# Altium PCB MainBoardPCB_4.PcbDoc (part 20 of 32)
Units mm, origin at the board's own origin, x right, y up, seen from the top; angles counter-clockwise.
Board outline 333.63 x 349.38 mm, 16 copper layers (L1, L2 (GND), L3 (Sign), L4 (GND), L5 (Sign), L6 (PWR/GND), L7(PWR/GND), L8 (Plane_GND), L9 (PWR/GND), L10 (PWR/GND), L11 (PWR/GND), L12 (Sign), L13 (GND), L14 (Sign), L15 (GND), L16), stack 2.502 mm thick; 2205 components, 1648 nets, 8314 pads, 3172 vias.
Unrouted connection lines stored in the file: 5141.
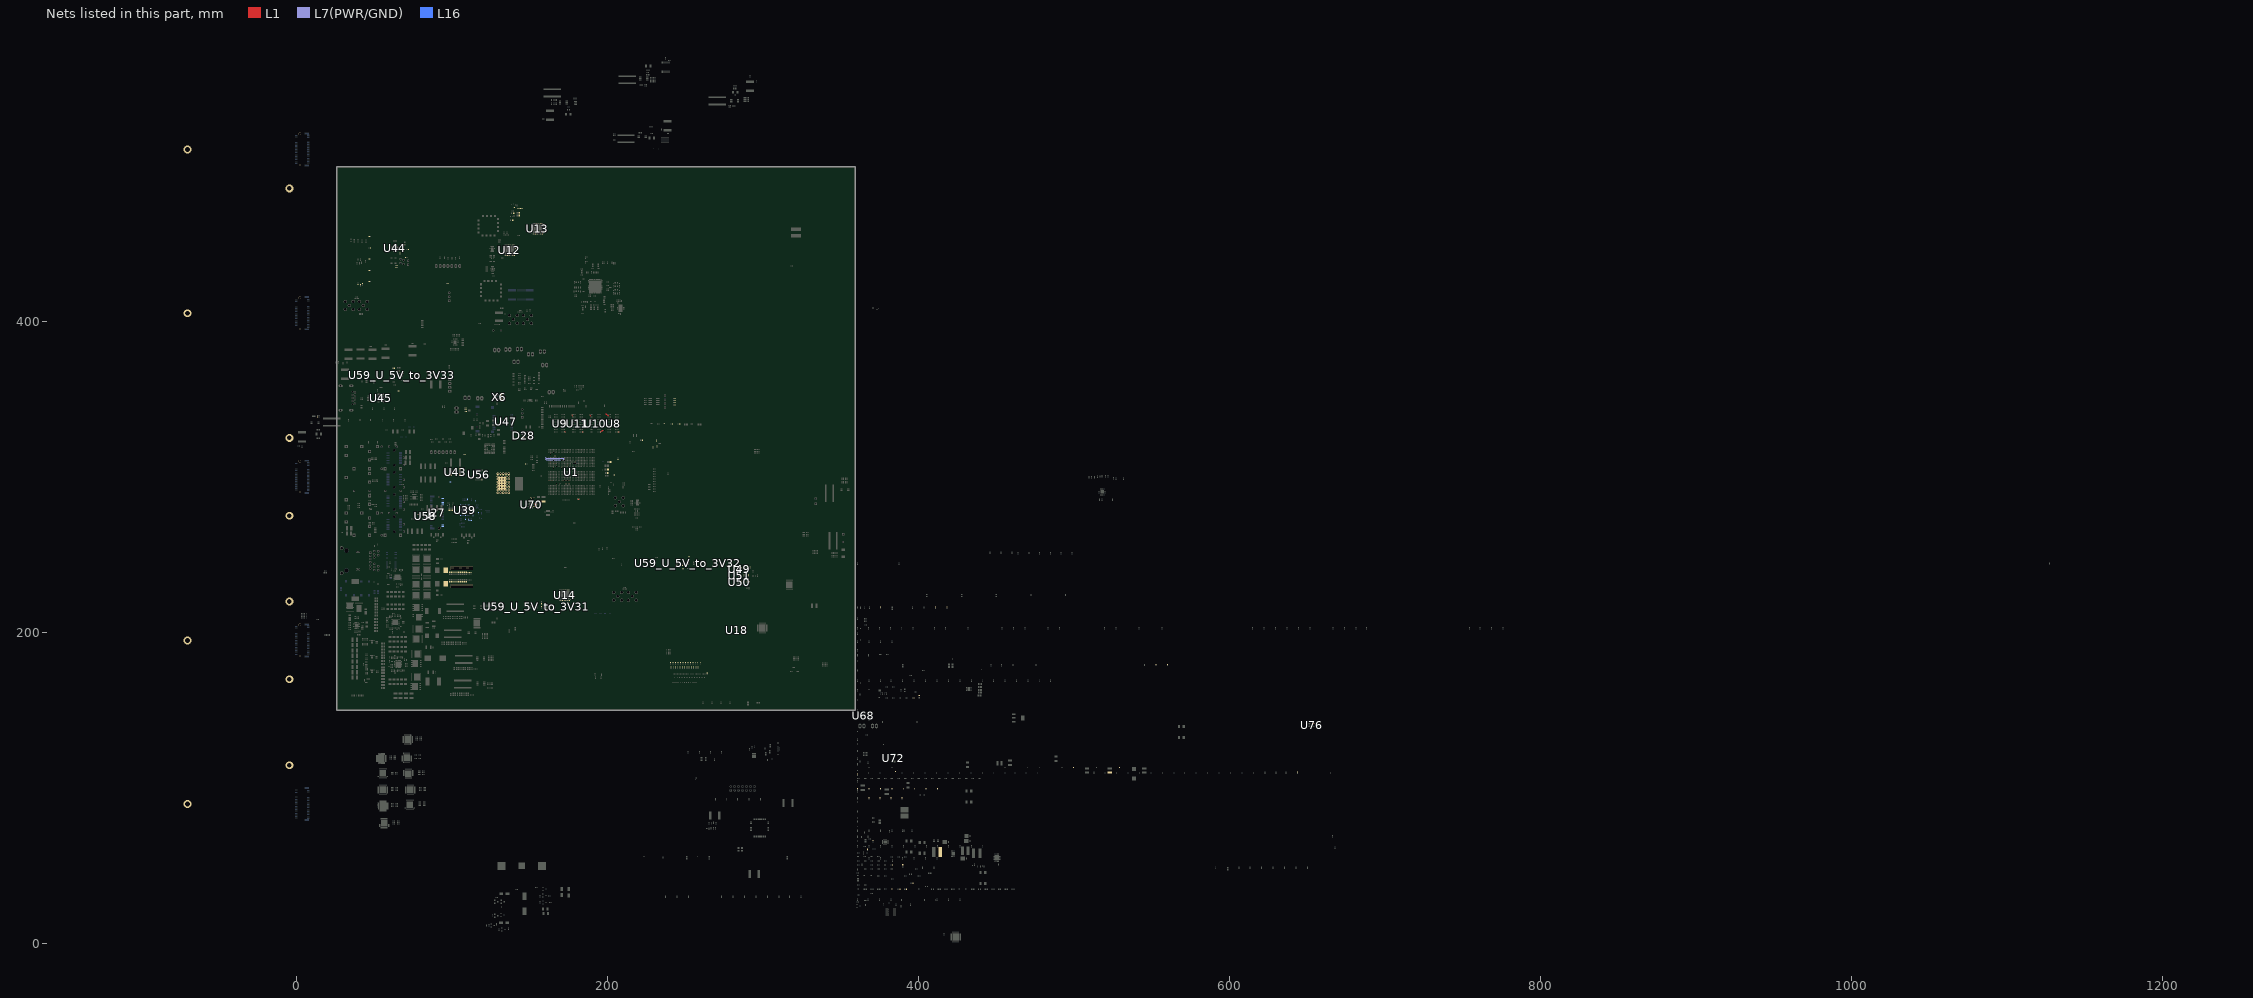
[diagram p21: the nets of this part, all layers, seen from the top]

## Part data (continued)
U4 U5 U48: Manufacturer 1="Texas Instruments", Supplier Part Number 1=296-53412-1-ND, Manufacturer Part Number 1=TPS2121 (continued)
  U5: ComponentLink1Description=Datasheet, ComponentLink1URL=http://www.ti.com/lit/ds/symlink/tps2120.pdf
U6 U7 U17 U18 U20 U21 U22 U23 U46: "Current Limit Load Switch with OVP and TRCB, 28 V, 5 A", Manufacturer 1="ON Semiconductor", Supplier Part Number 1=863-FPF2895CUCX, Manufacturer Part Number 1=FPF2895CUCX, Pricing 1="1=2,18000, 10=1,85000, 100=1,48000, 500=1,29000, 1000=1,07000, 3000=1,00000, 6000=0,96500, 9000=0,92800, 24000=0,89200 (USD)", RoHS=No, Stock 1=808, Supplier 1=Mouser
U8 U9 U10 U11: "RAM 8GB", Frequency=1.2GHz, Manufacturer="Micron Technology", Manufacturer Part Number=MT40A512M16JY-083EIT:BTR, Max Operating Temperature=95°C, Min Operating Temperature=-40°C, Supplier Part Number 1=557-1690-2-ND, ComponentLink1Description=https://www.micron.com/~/media/documents/products/data-sheet/dram/ddr4/8gb_ddr4_sdram.pdf?src-supplier=Digi-Key, ComponentLink1URL=https://www.micron.com/~/media/documents/products/data-sheet/dram/ddr4/8gb_ddr4_sdram.pdf?src-supplier=Digi-Key, Interface=Parallel, Memory Type=RAM,SDRAM, Pricing 1="2000 = 12,80254 (USD)", RoHS=Yes, Stock 1=0, Supplier 1=Digi-Key
U12 U13 U14: "Dystrybutor Zegarów", Manufacturer="Analog Devices", Manufacturer Part Number=LTC6952IUKG#PBF, Supplier Part Number 1=LTC6952IUKG#PBF-ND, Number of Pins=52, Pricing 1="1 = 30,78000, 25 = 24,62680, 100 = 21,36000, 250 = 20,50564, 500 = 19,86492 (USD)", RoHS=No, Stock 1=267, Supplier 1=Digi-Key
U15 U24_SPI_bridge1 U24_SPI_bridge2 U24_SPI_bridge3 U25_SPI_bridge1 U25_SPI_bridge2 U25_SPI_bridge3 U26_SPI_bridge1 U26_SPI_bridge2 U26_SPI_bridge3 U27_SPI_bridge1 U27_SPI_bridge2 U27_SPI_bridge3 U28_SPI_bridge1 U28_SPI_bridge2 U28_SPI_bridge3 U43 U53 U56 U57 U79: Manufacturer 1="Texas Instruments", Supplier Part Number 1=296-SN74AXC4T774PWRCT-ND, Manufacturer Part Number 1=SN74AXC4T774PWR, Pricing 1="1=1,14000, 10=1,01500, 100=0,79120, 500=0,65364, 1000=0,51603 (USD)", RoHS=No, Stock 1=2000, Supplier 1=Digi-Key
U16: Manufacturer="Texas Instruments", Manufacturer Part Number=LMK05028RGCR, Supplier Part Number 1=296-49099-1-ND, ComponentLink1Description=http://www.ti.com/lit/ds/symlink/lmk05028.pdf?src-supplier=Digi-Key, ComponentLink1URL=http://www.ti.com/lit/ds/symlink/lmk05028.pdf?src-supplier=Digi-Key, Number of Inputs=4, Number of Outputs=8, Pricing 1="1 = 32,36000, 10 = 29,84800, 100 = 25,48800 (USD)", RoHS=No, Stock 1=230, Supplier 1=Digi-Key, Supplier 2=Digi-Key, Supplier 3=Mouser, Supplier Part Number 2=296-49099-6-ND, Supplier Part Number 3=595-LMK05028RGCT
U19: "Quad 40 V / 1 A Step-Down Switching Regulator with 100% Duty Cycle Operation, 28-pin QFN (UFD-28), -40 to 125 degC, Pb-Free", Manufacturer="Linear Technology", Supplier Part Number 1=LT3504EUFD#PBF-ND, Code_JEDEC=MO-220, ComponentLink1Description="Manufacturer URL", ComponentLink1URL=http://www.linear.com/, ComponentLink2Description=Datasheet, ComponentLink2URL=http://cds.linear.com/docs/en/datasheet/3504fa.pdf, ComponentLink3Description="Package Specification", ComponentLink3URL=http://cds.linear.com/docs/en/packaging/QFN_28_05-08-1712.pdf, Mounting Technology="Surface Mount", Number of Outputs=4, PackageDescription="28-Pin Plastic QFN, Body 5 x 4 mm, Pitch 0.5 mm", PackageReference=UFD-28, PackageVersion="Rev. B, 06/2010", PartNumber=LT3504EUFD#PBF, RoHS=TRUE, Supplier 1=Digi-Key, Supplier 2=Farnell, Supplier 3=Newark, Supplier Part Number 2=2215129, Supplier Part Number 3=27W9523
U30: "DAC 20bit", Case/Package=SSOP, Manufacturer="Texas Instruments", Manufacturer Part Number=DAC1220E, Max Operating Temperature=85°C, Max Supply Voltage=5.25V, Min Operating Temperature=-40°C, Min Supply Voltage=4.75V, Nominal Supply Current=460uA, Operating Supply Voltage=5V, Package Quantity=75, Power Consumption=2.5mW, Supplier Part Number 1=DAC1220E-ND, ComponentLink1Description=https://datasheet.ciiva.com/1494/1762528-1494337.pdf?src-supplier=Element14, ComponentLink1URL=https://datasheet.ciiva.com/1494/1762528-1494337.pdf?src-supplier=Element14, ComponentLink2Description=https://datasheet.ciiva.com/25983/sbas082g-25983810.pdf?src-supplier=Avnet+Europe, ComponentLink2URL=https://datasheet.ciiva.com/25983/sbas082g-25983810.pdf?src-supplier=Avnet+Europe, ComponentLink3Description=https://datasheet.ciiva.com/14152/uz642298-e-14152445.pdf?src-supplier=Distrelec, ComponentLink3URL=https://datasheet.ciiva.com/14152/uz642298-e-14152445.pdf?src-supplier=Distrelec, ComponentLink4Description=https://datasheet.ciiva.com/26804/dac1220e-26804784.pdf?src-supplier=IIIC, ComponentLink4URL=https://datasheet.ciiva.com/26804/dac1220e-26804784.pdf?src-supplier=IIIC, ComponentLink5Description=https://datasheet.ciiva.com/15146/getdatasheetpartid-224186-15146981.pdf?src-supplier=Verical, ComponentLink5URL=https://datasheet.ciiva.com/15146/getdatasheetpartid-224186-15146981.pdf?src-supplier=Verical, ComponentLink6Description=https://datasheet.ciiva.com/3040/sbas082g-3040444.pdf?src-supplier=Avnet, ComponentLink6URL=https://datasheet.ciiva.com/3040/sbas082g-3040444.pdf?src-supplier=Avnet, ComponentLink7Description=https://datasheet.ciiva.com/1364/dac1220-1364430.pdf?src-supplier=Digi-Key, ComponentLink7URL=https://datasheet.ciiva.com/1364/dac1220-1364430.pdf?src-supplier=Digi-Key, Contact Plating=Gold, Conversion Rate=500S/s, Differential Nonlinearity=1LSB, Full Scale Error=10LSB, Height=1.5mm, Integral Nonlinearity (INL)=1LSB, Interface=SPI, Lead Free="Lead Free", Length=5mm, Number of Bits=20, Number of Channels=1, Number of Converters=1, Number of DAC Channels=1, Number of Pins=16, Output Type=Voltage, Packaging=Rail/Tube, Polarity=Unipolar, Pricing 1="1 = 19,80000, 10 = 18,19400, 25 = 17,44000, 100 = 15,36600, 500 = 13,66916 (USD)", Radiation Hardening=No, REACH SVHC="No SVHC", Resolution=20b, RoHS=Yes, Sampling Rate=500S/s, Settling Time=2000us, Stock 1=237, Supplier 1=Digi-Key, Supply Type=Analog,Digital, Weight=0.002603oz, Width=4mm
U31 U32: "IC BUFFER 2:4 LVPECL MUX 16QFN", Case/Package=QFN, Frequency=1.25GHz, Manufacturer 1="Silicon Labs", Max Operating Temperature=85°C, Max Supply Voltage=3.63V, Min Operating Temperature=-40°C, Min Supply Voltage=2.38V, Nominal Supply Current=210mA, Package Quantity=100, Supplier Part Number 1=336-2500-5-ND, ComponentLink1Description=https://datasheet.ciiva.com/24019/si53323-258666-24019274.pdf?src-supplier=Mouser, ComponentLink1URL=https://datasheet.ciiva.com/24019/si53323-258666-24019274.pdf?src-supplier=Mouser, ComponentLink2Description=https://datasheet.ciiva.com/30480/0900766b812accf9-30480970.pdf?src-supplier=RSComponents, ComponentLink2URL=https://datasheet.ciiva.com/30480/0900766b812accf9-30480970.pdf?src-supplier=RSComponents, ComponentLink3Description=https://datasheet.ciiva.com/29883/si53323-29883370.pdf?src-supplier=Avnet, ComponentLink3URL=https://datasheet.ciiva.com/29883/si53323-29883370.pdf?src-supplier=Avnet, ComponentLink4Description=https://datasheet.ciiva.com/46413/1813444-46413388.pdf?src-supplier=Element14, ComponentLink4URL=https://datasheet.ciiva.com/46413/1813444-46413388.pdf?src-supplier=Element14, ComponentLink5Description=https://datasheet.ciiva.com/18646/si53323-18646941.pdf?src-supplier=Digi-Key, ComponentLink5URL=https://datasheet.ciiva.com/18646/si53323-18646941.pdf?src-supplier=Digi-Key, Height=0.85mm, Input=LVCMOS, Length=3mm, Logic Function=Clock, Manufacturer Part Number 1=SI53323-B-GM, Max Duty Cycle=54%, Max Frequency=1.25GHz, Mount="Surface Mount", Number of Circuits=1, Number of Outputs=4, Number of Pins=16, Packaging=Rail/Tube, Pricing 1="1=1,76000, 25=1,61120, 100=1,46480, 1000=1,31828 (USD)", Propagation Delay=0.975ns, REACH SVHC=Unknown, RoHS=Yes, Stock 1=40, Supplier 1=Digi-Key, Width=3mm
U33: "IC, BUF LVPECL CLOCK DRVR 16-VQFN", Case/Package=QFN, Frequency=800MHz, Input Current=10uA, Manufacturer="Texas Instruments", Max Operating Temperature=85°C, Max Supply Voltage=3.6V, Min Operating Temperature=-40°C, Min Supply Voltage=3V, Package Quantity=1, Supplier Part Number 1=296-17045-1-ND, Category="Clock Buffers, Drivers", ComponentLink1Description=https://datasheet.ciiva.com/6676/cdcm1802-6676992.pdf?src-supplier=Digi-Key, ComponentLink1URL=https://datasheet.ciiva.com/6676/cdcm1802-6676992.pdf?src-supplier=Digi-Key, ComponentLink2Description=https://datasheet.ciiva.com/1138/1536203-1138821.pdf?src-supplier=Element14, ComponentLink2URL=https://datasheet.ciiva.com/1138/1536203-1138821.pdf?src-supplier=Element14, ComponentLink3Description=https://datasheet.ciiva.com/1141/1772468-1141254.pdf?src-supplier=Farnell, ComponentLink3URL=https://datasheet.ciiva.com/1141/1772468-1141254.pdf?src-supplier=Farnell, ComponentLink4Description=https://datasheet.ciiva.com/14295/cdcm1802-14295382.pdf?src-supplier=Avnet, ComponentLink4URL=https://datasheet.ciiva.com/14295/cdcm1802-14295382.pdf?src-supplier=Avnet, ComponentLink5Description=https://datasheet.ciiva.com/26794/cdcm1802rgtt-26794108.pdf?src-supplier=IIIC, ComponentLink5URL=https://datasheet.ciiva.com/26794/cdcm1802rgtt-26794108.pdf?src-supplier=IIIC, ComponentLink6Description=https://datasheet.ciiva.com/15152/getdatasheetpartid-184104-15152981.pdf?src-supplier=Verical, ComponentLink6URL=https://datasheet.ciiva.com/15152/getdatasheetpartid-184104-15152981.pdf?src-supplier=Verical, ComponentLink7Description=https://datasheet.ciiva.com/1187/cdcm1802-1187191.pdf?src-supplier=Digi-Key, ComponentLink7URL=https://datasheet.ciiva.com/1187/cdcm1802-1187191.pdf?src-supplier=Digi-Key, ComponentLink8Description=https://datasheet.ciiva.com/1187/cdcm1802-1187192.pdf?src-supplier=Digi-Key, ComponentLink8URL=https://datasheet.ciiva.com/1187/cdcm1802-1187192.pdf?src-supplier=Digi-Key, ComponentLink9Description=https://datasheet.ciiva.com/3304/cdcm1802-3304747.pdf?src-supplier=Avnet, ComponentLink9URL=https://datasheet.ciiva.com/3304/cdcm1802-3304747.pdf?src-supplier=Avnet, Contact Plating=Gold, Height=0.9mm, Input=LVTTL, Lead Free="Lead Free", Length=3mm, Logic Function=Buffer,Clock, Manufacturer Part Number=CDCM1802RGTT, Max Frequency=800MHz, Mount="Surface Mount", Nominal Supply Current=10uA, Number of Circuits=1, Number of Outputs=1, Number of Pins=16, Packaging="Tape and Reel", Pricing 1="1=11,18000, 10=10,27700, 25=9,85160, 100=8,67990 (USD)", Propagation Delay=600ps, Radiation Hardening=No, REACH SVHC="No SVHC", RoHS=Yes, Stock 1=774, Supplier 1=Digi-Key, Termination=SMD/SMT, Weight=0.000808oz, Width=3mm
U34 U37 U38: "Analog Devices", Case/Package="LFCSP EP", Max Input Voltage=20V, Max Operating Temperature=85°C, Max Output Current=30A, Min Input Voltage=2.75V, Min Operating Temperature=-40°C, Nominal Supply Current=4.5mA, Operating Supply Current=100uA, Output Current=25A, Output Voltage=18V, Supplier Part Number 1=ADP1850ACPZ-R7CT-ND, Switching Frequency=1.5MHz, Clock Sync=Yes, ComponentLink1Description=https://datasheet.ciiva.com/3217/adp1850-3217744.pdf?src-supplier=Avnet, ComponentLink1URL=https://datasheet.ciiva.com/3217/adp1850-3217744.pdf?src-supplier=Avnet, ComponentLink2Description=https://datasheet.ciiva.com/8306/adp1850-8306183.pdf?src-supplier=Avnet, ComponentLink2URL=https://datasheet.ciiva.com/8306/adp1850-8306183.pdf?src-supplier=Avnet, ComponentLink3Description=https://datasheet.ciiva.com/2015/adp1850-2015067.pdf?src-supplier=Digi-Key, ComponentLink3URL=https://datasheet.ciiva.com/2015/adp1850-2015067.pdf?src-supplier=Digi-Key, ComponentLink4Description=https://datasheet.ciiva.com/17297/adp1850-17297115.pdf?src-supplier=Avnet+Europe, ComponentLink4URL=https://datasheet.ciiva.com/17297/adp1850-17297115.pdf?src-supplier=Avnet+Europe, ComponentLink5Description=https://datasheet.ciiva.com/2015/adp1850-2015068.pdf?src-supplier=Digi-Key, ComponentLink5URL=https://datasheet.ciiva.com/2015/adp1850-2015068.pdf?src-supplier=Digi-Key, ComponentLink6Description=https://datasheet.ciiva.com/2015/adp1850-2015069.pdf?src-supplier=Digi-Key, ComponentLink6URL=https://datasheet.ciiva.com/2015/adp1850-2015069.pdf?src-supplier=Digi-Key, Contact Plating=Tin,Matte, Lead Free="Contains Lead", Manufacturer 1="Analog Devices", Manufacturer Part Number 1=ADP1850ACPZ-R7, Max Duty Cycle=90%, Max Supply Voltage=20V, Min Supply Voltage=2.75V, Number of Output Phases=2, Number of Outputs=2, Number of Pins=32, Output Configuration=Positive, Packaging="Tape and Reel", Pricing 1="1=4,61000, 10=4,14300, 25=3,91640, 100=3,39440, 250=3,22028, 500=2,88956 (USD)", Radiation Hardening=No, REACH SVHC="No SVHC", RoHS=Yes, Stock 1=1022, Supplier 1=Digi-Key, Synchronous Rectifier=Yes
U35_I2C_Expander1 U35_I2C_Expander1_1 U35_I2C_Expander2 U35_I2C_Expander2_1 U35_I2C_Expander3 U35_I2C_Expander3_1 U35_I2C_Expander? U35_I2C_Expander_10 U35_I2C_Expander_11 U35_I2C_Expander_12 U35_I2C_Expander_13 U35_I2C_Expander_14 U35_I2C_Expander_16 U35_I2C_Expander_16_1: "16-Bit I/O Expander with Serial Interface, 28-Pin QFN, Extended Temperature", Manufacturer=Microchip, Supplier Part Number 1=MCP23017-E/ML-ND, Code_JEDEC=MO-220, ComponentLink1Description="Manufacturer URL", ComponentLink1URL=http://www.microchip.com/, ComponentLink2Description=Datasheet, ComponentLink2URL=http://ww1.microchip.com/downloads/en/DeviceDoc/21952b.pdf, ComponentLink3Description="Package Specification", ComponentLink3URL=http://www.microchip.com/stellent/groups/techpub_sg/documents/packagingspec/en012702.pdf, DatasheetVersion="revB, Feb-2007", Mounting Technology="Surface Mount", PackageDescription="28-Lead Plastic Quad Flat, No Lead Package (ML) - 6x6 mm Body [QFN] with 0.55 mm Contact Length", PackageReference=QFN-ML28, PackageVersion="revBB, Aug-2009", PartNumber=MCP23017-E/ML, Supplier 1=Digi-Key, Supplier 2=Newark, Supplier 3=Mouser, Supplier Part Number 2=31K2957, Supplier Part Number 3=579-MCP23017-E/ML
U36_U_Translator_I2C1 U36_U_Translator_I2C2 U36_U_Translator_I2C3 U36_U_Translator_I2C4: "I2C [V] Level translator", Low Level Output Current=128mA, Manufacturer="Texas Instruments", Manufacturer Part Number=PCA9306DQER, Max Operating Temperature=85°C, Max Supply Voltage=5V, Min Operating Temperature=-40°C, Min Supply Voltage=0uV, Package Quantity=1, Supplier Part Number 1=296-27957-1-ND, ComponentLink1Description=https://datasheet.ciiva.com/1899/pca9306-1899328.pdf?src-supplier=Digi-Key, ComponentLink1URL=https://datasheet.ciiva.com/1899/pca9306-1899328.pdf?src-supplier=Digi-Key, ComponentLink2Description=https://datasheet.ciiva.com/22631/1719693-22631024.pdf?src-supplier=Element14, ComponentLink2URL=https://datasheet.ciiva.com/22631/1719693-22631024.pdf?src-supplier=Element14, ComponentLink3Description=https://datasheet.ciiva.com/15095/getdatasheetpartid-306496-15095555.pdf?src-supplier=Verical, ComponentLink3URL=https://datasheet.ciiva.com/15095/getdatasheetpartid-306496-15095555.pdf?src-supplier=Verical, ComponentLink4Description=https://datasheet.ciiva.com/1504/1862428-1504149.pdf?src-supplier=Element14, ComponentLink4URL=https://datasheet.ciiva.com/1504/1862428-1504149.pdf?src-supplier=Element14, ComponentLink5Description=https://datasheet.ciiva.com/26041/pca9306-26041014.pdf?src-supplier=Avnet+Europe, ComponentLink5URL=https://datasheet.ciiva.com/26041/pca9306-26041014.pdf?src-supplier=Avnet+Europe, ComponentLink6Description=https://datasheet.ciiva.com/14287/pca9306-14287374.pdf?src-supplier=Avnet, ComponentLink6URL=https://datasheet.ciiva.com/14287/pca9306-14287374.pdf?src-supplier=Avnet, ComponentLink7Description=https://datasheet.ciiva.com/1899/pca9306-1899326.pdf?src-supplier=Digi-Key, ComponentLink7URL=https://datasheet.ciiva.com/1899/pca9306-1899326.pdf?src-supplier=Digi-Key, ComponentLink8Description=https://datasheet.ciiva.com/14287/pca9306-14287470.pdf?src-supplier=Avnet, ComponentLink8URL=https://datasheet.ciiva.com/14287/pca9306-14287470.pdf?src-supplier=Avnet, ComponentLink9Description=https://datasheet.ciiva.com/1899/pca9306-1899327.pdf?src-supplier=Digi-Key, ComponentLink9URL=https://datasheet.ciiva.com/1899/pca9306-1899327.pdf?src-supplier=Digi-Key, Height=0.35mm, Lead Free="Lead Free", Length=1.45mm, Logic Function=Translator, Number of Bits=2, Number of Channels=2, Number of Outputs=2, Number of Pins=8, Output Type=I2C, Packaging="Tape and Reel", Pricing 1="1 = 0,67000, 10 = 0,59100, 100 = 0,45340, 500 = 0,35844, 1000 = 0,28675 (USD)", Propagation Delay=0.3ns, Radiation Hardening=No, REACH SVHC="No SVHC", RoHS=Yes, Stock 1=43494, Supplier 1=Digi-Key, Turn-On Delay Time=1.4ns, Width=1.05mm
U39: "IC ETHERNET PHY 48VQFN", Case/Package=VQFN, Manufacturer 1="Texas Instruments", Max Operating Temperature=105°C, Max Supply Voltage=2.625V, Min Operating Temperature=-40°C, Min Supply Voltage=950mV, Supplier Part Number 1=296-43254-1-ND, Cable Length=130m, ComponentLink1Description=http://www.ti.com/general/docs/lit/getliterature.tsp?genericPartNumber=DP83867E&&fileType=pdf&src-supplier=Element14, ComponentLink1URL=http://www.ti.com/general/docs/lit/getliterature.tsp?genericPartNumber=DP83867E&&fileType=pdf&src-supplier=Element14, ComponentLink2Description=http://www.ti.com/lit/ds/symlink/dp83867e.pdf?src-supplier=Avnet, ComponentLink2URL=http://www.ti.com/lit/ds/symlink/dp83867e.pdf?src-supplier=Avnet, ComponentLink3Description=http://www.ti.com/general/docs/lit/getliterature.tsp?genericPartNumber=DP83867E&amp;&amp;fileType=pdf&src-supplier=Farnell, ComponentLink3URL=http://www.ti.com/general/docs/lit/getliterature.tsp?genericPartNumber=DP83867E&amp;&amp;fileType=pdf&src-supplier=Farnell, ComponentLink4Description=http://www.ti.com/lit/ds/symlink/dp83867e.pdf?src-supplier=Digi-Key, ComponentLink4URL=http://www.ti.com/lit/ds/symlink/dp83867e.pdf?src-supplier=Digi-Key, ComponentLink5Description=http://www.ti.com/lit/gpn/dp83867e?src-supplier=Mouser, ComponentLink5URL=http://www.ti.com/lit/gpn/dp83867e?src-supplier=Mouser, Data Rate=1Gbps, Interface=Serial, Lead Free="Lead Free", Manufacturer Part Number 1=DP83867ERGZT, Number of Pins=48, Packaging="Cut Tape", Pricing 1="1=10,84000, 10=9,95900, 25=9,54640, 100=7,99850 (USD)", REACH SVHC="No SVHC", RoHS=Yes, Stock 1=2988, Supplier 1=Digi-Key
U40 U42 U49 U50 U51 U59_5V_to_3V3_for_FTDI U59_U_5V_to_3V31 U59_U_5V_to_3V32 U59_U_5V_to_3V33: "IC REG LDO ADJ 1.5A 8DFN", Case/Package=DFN, Dropout Voltage=330mV, Input Bias Current=120uA, Manufacturer 1=Microchip, Max Input Voltage=6V, Max Operating Temperature=125°C, Max Output Current=1.5A, Min Input Voltage=2.3V, Min Operating Temperature=-40°C, Output Voltage=5V, Package Quantity=3300, Reference Voltage=410mV, Supplier Part Number 1=MCP1727T-ADJE/MFCT-ND, Accuracy=0.5%, ComponentLink1Description=https://datasheet.ciiva.com/2057/21999b-2057048.pdf?src-supplier=Digi-Key, ComponentLink1URL=https://datasheet.ciiva.com/2057/21999b-2057048.pdf?src-supplier=Digi-Key, ComponentLink2Description=https://datasheet.ciiva.com/8237/jp027822-8237704.pdf?src-supplier=Avnet, ComponentLink2URL=https://datasheet.ciiva.com/8237/jp027822-8237704.pdf?src-supplier=Avnet, ComponentLink3Description=https://datasheet.ciiva.com/17364/jp027822-17364137.pdf?src-supplier=Avnet+Europe, ComponentLink3URL=https://datasheet.ciiva.com/17364/jp027822-17364137.pdf?src-supplier=Avnet+Europe, Contact Plating=Tin,Matte, Lead Free="Lead Free", Manufacturer Part Number 1=MCP1727T-ADJE/MF, Mount="Surface Mount", Number of Outputs=1, Output Current=1.5A, Output Type=Adjustable, Packaging="Tape and Reel", Polarity=Positive, Pricing 1="1=0.84000, 25=0.71080, 100=0.63860 (USD)", Quiescent Current=120uA, Radiation Hardening=No, RoHS=Yes, Stock 1=9419, Supplier 1=Digi-Key
U41: "IC FLASH 64G MMC", Manufacturer 1="Micron Technology", Supplier Part Number 1=340-296563-REEL, Manufacturer Part Number 1=MTFC8GAKAJCN-4MITTR, Pricing 1="1=17,08000, 10=15,72000, 25=15,39000, 50=15,34000, 100=13,76000, 250=13,34000, 500=12,69000, 1000=11,13000, 2000=10,32000 (USD)", RoHS=No, Stock 1=3395, Supplier 1=Mouser
U44: "IC SUPERVISORY CIRC DL 16TQFN", Manufacturer=Maxim, Max Operating Temperature=125°C, Max Power Dissipation=2W, Max Supply Voltage=28V, Min Operating Temperature=-40°C, Min Supply Voltage=2.2V, Number of Voltages Monitored=2, Operating Supply Current=52uA, Package Quantity=2500, Supplier Part Number 1=MAX16025TE+TCT-ND, Category="Voltage Supervisors", ComponentLink1Description=https://datasheet.ciiva.com/1995/max16025-max16030-1995540.pdf?src-supplier=Digi-Key, ComponentLink1URL=https://datasheet.ciiva.com/1995/max16025-max16030-1995540.pdf?src-supplier=Digi-Key, ComponentLink2Description=https://datasheet.ciiva.com/13028/max16025-max16030-43326-13028393.pdf?src-supplier=Mouser, ComponentLink2URL=https://datasheet.ciiva.com/13028/max16025-max16030-43326-13028393.pdf?src-supplier=Mouser, Lead Free="Lead Free", Manufacturer Part Number=MAX16025TE+T, Mount="Surface Mount", Number of Pins=16, Packaging="Tape and Reel", Pricing 1="1=4,87000, 10=3,85200, 25=3,51240, 100=3,05910, 250=2,83252 (USD)", Reset="Active Low", Reset Timeout=140ms, RoHS=Yes, Stock 1=1731, Supplier 1=Digi-Key, Type=Sequencer, Watchdog Timer=No
U45: "IC TXRX USB 2.0 FLEXPWR 32QFN", Case/Package=QFN, Frequency=60MHz, Manufacturer 1=Microchip, Max Operating Temperature=85°C, Min Operating Temperature=-40°C, Operating Supply Current=18uA, Operating Supply Voltage=5.5V, Package Quantity=4000, Supplier Part Number 1=USB3320C-EZK-DKR-ND, ComponentLink1Description=https://datasheet.ciiva.com/29718/3320-29718762.pdf?src-supplier=Digi-Key, ComponentLink1URL=https://datasheet.ciiva.com/29718/3320-29718762.pdf?src-supplier=Digi-Key, ComponentLink2Description=https://datasheet.ciiva.com/6635/filehandler-aspxddocname-en562261-6635128.pdf?src-supplier=Digi-Key, ComponentLink2URL=https://datasheet.ciiva.com/6635/filehandler-aspxddocname-en562261-6635128.pdf?src-supplier=Digi-Key, ComponentLink3Description=https://datasheet.ciiva.com/29718/filehandler-aspxddocname-en562261-29718763.pdf?src-supplier=Digi-Key, ComponentLink3URL=https://datasheet.ciiva.com/29718/filehandler-aspxddocname-en562261-29718763.pdf?src-supplier=Digi-Key, Data Rate=12Mbps, ESD Protection=Yes, Height=0.95mm, Interface=UART, Lead Free="Lead Free", Length=5.1mm, Manufacturer Part Number 1=USB3320C-EZK-TR, Number of Pins=32, Number of Transceivers=1, Packaging="Tape and Reel", Pricing 1="1=1,55000, 25=1,29000 (USD)", Radiation Hardening=No, Receiver Hysteresis=50mV, RoHS=Yes, Simplex/Duplex="Half Duplex", Stock 1=3750, Supplier 1=Digi-Key, Weight=0.006653oz, Width=5.1mm
U47: "Memory Card Interface 25-WLCSP (2.04x2.04)", Manufacturer 1="Nexperia USA", Supplier Part Number 1=1727-8607-1-ND, ComponentLink1Description=Datasheet, ComponentLink1URL=https://assets.nexperia.com/documents/data-sheet/IP4856CX25_C.pdf, Manufacturer Part Number 1=IP4856CX25/CZ, Pricing 1="1=1,52000, 10=1,36500, 100=1,03000, 500=0,87550, 1000=0,69525 (USD)", RoHS=No, Stock 1=3532, Supplier 1=Digi-Key
U54: "MICROCHIP - 93LC56BT-I/OT. - 2K, 128 X 16, SERIAL EE, IND ROHS COMPLIANT: YES", Case/Package=SOT-23, Frequency=2MHz, Manufacturer=Microchip, Max Operating Temperature=85°C, Max Supply Voltage=5.5V, Min Operating Temperature=-40°C, Min Supply Voltage=2.5V, Nominal Supply Current=2mA, Package Quantity=3000, Supplier Part Number 1=93LC56BT-I/OTCT-ND, Access Time=250ns, Category=EEPROM, ComponentLink1Description=https://datasheet.ciiva.com/48496/jp013939-48496476.pdf?src-supplier=Avnet, ComponentLink1URL=https://datasheet.ciiva.com/48496/jp013939-48496476.pdf?src-supplier=Avnet, ComponentLink2Description=https://datasheet.ciiva.com/16216/filehandler-aspxddocname-en013939-16216574.pdf?src-supplier=Future+Electronics, ComponentLink2URL=https://datasheet.ciiva.com/16216/filehandler-aspxddocname-en013939-16216574.pdf?src-supplier=Future+Electronics, ComponentLink3Description=https://datasheet.ciiva.com/3185/jp013939-3185519.pdf?src-supplier=Avnet, ComponentLink3URL=https://datasheet.ciiva.com/3185/jp013939-3185519.pdf?src-supplier=Avnet, ComponentLink4Description=https://datasheet.ciiva.com/16622/jp013939-16622127.pdf?src-supplier=Avnet+Europe, ComponentLink4URL=https://datasheet.ciiva.com/16622/jp013939-16622127.pdf?src-supplier=Avnet+Europe, Contact Plating=Tin,Matte, Density=2Kb, Height=1.3mm, Interface=Serial, Lead Free="Lead Free", Length=3.1mm, Manufacturer Part Number=93LC56BT-I/OT, Max Frequency=2MHz, Memory Size=2Kb, Memory Type=EEPROM, Mount="Surface Mount", Number of Pins=6, Packaging="Tape and Reel", Pricing 1="1=0,22000, 25=0,21000, 100=0,20630 (USD)", Radiation Hardening=No, REACH SVHC="No SVHC", RoHS=Yes, Stock 1=9343, Supplier 1=Digi-Key, Width=1.8mm
U55: "IC USB HS QUAD UART/SYNC 64-LQFP", Case/Package=LQFP, Dual Supply Voltage=3.3V, Manufacturer 1=FTDI, Max Operating Temperature=85°C, Max Supply Voltage=3.63V, Min Operating Temperature=-40°C, Min Supply Voltage=1.62V, Operating Supply Current=70mA, Package Quantity=1000, Supplier Part Number 1=768-1026-1-ND, ComponentLink1Description=https://datasheet.ciiva.com/26852/getdatasheetpartid-643215-26852858.pdf?src-supplier=Verical, ComponentLink1URL=https://datasheet.ciiva.com/26852/getdatasheetpartid-643215-26852858.pdf?src-supplier=Verical, ComponentLink2Description=https://datasheet.ciiva.com/26841/ft4232hl-reel-26841744.pdf?src-supplier=IIIC, ComponentLink2URL=https://datasheet.ciiva.com/26841/ft4232hl-reel-26841744.pdf?src-supplier=IIIC, ComponentLink3Description=https://datasheet.ciiva.com/48909/70403916-48909061.pdf?src-supplier=Allied+Electronics, ComponentLink3URL=https://datasheet.ciiva.com/48909/70403916-48909061.pdf?src-supplier=Allied+Electronics, ComponentLink4Description=https://datasheet.ciiva.com/1787/ds-ft4232h-1787078.pdf?src-supplier=Digi-Key, ComponentLink4URL=https://datasheet.ciiva.com/1787/ds-ft4232h-1787078.pdf?src-supplier=Digi-Key, ComponentLink5Description=https://datasheet.ciiva.com/16205/ds-ft4232h-16205384.pdf?src-supplier=Future+Electronics, ComponentLink5URL=https://datasheet.ciiva.com/16205/ds-ft4232h-16205384.pdf?src-supplier=Future+Electronics, ComponentLink6Description=https://datasheet.ciiva.com/1787/ds-ft4232h-1787077.pdf?src-supplier=Digi-Key, ComponentLink6URL=https://datasheet.ciiva.com/1787/ds-ft4232h-1787077.pdf?src-supplier=Digi-Key, ComponentLink7Description=https://datasheet.ciiva.com/1787/ds-ft4232h-1787079.pdf?src-supplier=Digi-Key, ComponentLink7URL=https://datasheet.ciiva.com/1787/ds-ft4232h-1787079.pdf?src-supplier=Digi-Key, Data Rate=480Mbps, ESD Protection=Yes, Height=1.4mm, Interface=UART, Lead Free="Lead Free", Length=10.1mm, Manufacturer Part Number 1=FT4232HL-REEL, Mount="Surface Mount", Number of Channels=1, Number of Pins=64, Number of Transceivers=4, Operating Supply Voltage=3.3V, Packaging="Tape and Reel", Pricing 1="1=8,30000, 10=8,09000, 50=7,46000, 100=7,14000, 500=6,88004 (USD)", Radiation Hardening=No, RoHS=Yes, Stock 1=12423, Supplier 1=Digi-Key, Weight=0.012088oz, Width=10.1mm
U58: Manufacturer 1=STMicroelectronics, Supplier Part Number 1=497-19784-1-ND, ComponentLink1Description=Datasheet, ComponentLink1URL=https://www.st.com/resource/en/datasheet/ism330dhcx.pdf, Manufacturer Part Number 1=ISM330DHCXTR, Pricing 1="1=7,85000, 10=7,09500, 25=6,76520, 100=5,87400, 500=5,11500, 1000=4,45500 (USD)", RoHS=No, Stock 1=4928, Supplier 1=Digi-Key
U60 U69: "IC REG LIN POS ADJ 2A 16LFCSP", Case/Package="LFCSP EP", Dropout Voltage=160mV, Manufacturer="Analog Devices", Max Input Voltage=3.6V, Max Operating Temperature=125°C, Max Output Current=2A, Max Output Voltage=3V, Max Supply Current=1.8mA, Min Current Limit=2.4A, Min Input Voltage=1.6V, Min Operating Temperature=-40°C, Min Output Voltage=750mV, Output Voltage Accuracy=1%, Power Supply Rejection Ratio (PSRR)=70dB, Supplier Part Number 1=ADP1741ACPZ-R7CT-ND, Accuracy=1%, ComponentLink1Description=https://datasheet.ciiva.com/2041/adp1740-1741-2041344.pdf?src-supplier=Digi-Key, ComponentLink1URL=https://datasheet.ciiva.com/2041/adp1740-1741-2041344.pdf?src-supplier=Digi-Key, ComponentLink2Description=https://datasheet.ciiva.com/15364/adp1740-1741-259394-15364336.pdf?src-supplier=Mouser, ComponentLink2URL=https://datasheet.ciiva.com/15364/adp1740-1741-259394-15364336.pdf?src-supplier=Mouser, ComponentLink3Description=https://datasheet.ciiva.com/23604/697190-23604608.pdf?src-supplier=Newark, ComponentLink3URL=https://datasheet.ciiva.com/23604/697190-23604608.pdf?src-supplier=Newark, ComponentLink4Description=https://datasheet.ciiva.com/2041/adp1740-1741-2041345.pdf?src-supplier=Digi-Key, ComponentLink4URL=https://datasheet.ciiva.com/2041/adp1740-1741-2041345.pdf?src-supplier=Digi-Key, ComponentLink5Description=https://datasheet.ciiva.com/3224/adp1740-1741-3224694.pdf?src-supplier=Avnet, ComponentLink5URL=https://datasheet.ciiva.com/3224/adp1740-1741-3224694.pdf?src-supplier=Avnet, ComponentLink6Description=https://datasheet.ciiva.com/17365/adp1740-1741-17365261.pdf?src-supplier=Avnet+Europe, ComponentLink6URL=https://datasheet.ciiva.com/17365/adp1740-1741-17365261.pdf?src-supplier=Avnet+Europe, ComponentLink7Description=https://datasheet.ciiva.com/2041/adp1740-1741-2041343.pdf?src-supplier=Digi-Key, ComponentLink7URL=https://datasheet.ciiva.com/2041/adp1740-1741-2041343.pdf?src-supplier=Digi-Key, Lead Free="Contains Lead", Manufacturer Part Number=ADP1741ACPZ-R7, Number of Outputs=1, Number of Pins=16, Number of Regulators=1, Operating Supply Current=1.8mA, Output Current=2A, Output Type=Adjustable, Output Voltage=3V, Packaging="Tape and Reel", Polarity=Positive, Pricing 1="1 = 3,42000, 10 = 3,07000, 25 = 2,90240, 100 = 2,51540, 250 = 2,38644, 500 = 2,14136 (USD)", Radiation Hardening=No, REACH SVHC="No SVHC", RoHS=Yes, Stock 1=7057, Supplier 1=Digi-Key
U61 U70: "IC REG LINEAR POS ADJ 1A 20QFN", Case/Package=QFN, Dropout Voltage=130mV, Manufacturer="Texas Instruments", Max Operating Temperature=125°C, Min Current Limit=1.5A, Min Operating Temperature=-40°C, Output Current=1A, Output Voltage=5V, Quiescent Current=2mA, Supplier Part Number 1=296-43312-1-ND, Category="Voltage References", ComponentLink1Description=http://www.ti.com/lit/gpn/tps7a88?src-supplier=Mouser, ComponentLink1URL=http://www.ti.com/lit/gpn/tps7a88?src-supplier=Mouser, ComponentLink2Description=http://www.ti.com/lit/ds/symlink/tps7a88.pdf?src-supplier=Digi-Key, ComponentLink2URL=http://www.ti.com/lit/ds/symlink/tps7a88.pdf?src-supplier=Digi-Key, ComponentLink3Description=http://www.ti.com/general/docs/lit/getliterature.tsp?genericPartNumber=TPS7A88&amp;&amp;fileType=pdf&src-supplier=Farnell, ComponentLink3URL=http://www.ti.com/general/docs/lit/getliterature.tsp?genericPartNumber=TPS7A88&amp;&amp;fileType=pdf&src-supplier=Farnell, Lead Free="Lead Free", Manufacturer Part Number=TPS7A8801RTJT, Mount="Surface Mount", Number of Outputs=2, Number of Pins=20, Number of Regulators=2, Packaging="Tape and Reel", Pricing 1="1=2,77000, 10=2,48700, 25=2,34600, 100=1,87670 (USD)", RoHS=Yes, Stock 1=1455, Supplier 1=Digi-Key
U62: "LINEAR TECHNOLOGY         LT3042EDD#PBF             LDO Voltage Regulator, Adjustable, 1.8V to 20V in, 350mV drop, 0V to 15V/0.2A out, DFN-10", Case/Package=DFN, Dropout Voltage=350mV, Manufacturer="Analog Devices / Linear Technology", Max Input Voltage=20V, Max Operating Temperature=125°C, Max Output Voltage=15V, Min Current Limit=220mA, Min Input Voltage=1.8V, Min Operating Temperature=-40°C, Min Output Voltage=0uV, Output Current=200mA, Supplier Part Number 1=LT3042EDD#PBF-ND, Category="Voltage Regulators - Linear", ComponentLink1Description=http://www.farnell.com/datasheets/1941078.pdf?src-supplier=Farnell, ComponentLink1URL=http://www.farnell.com/datasheets/1941078.pdf?src-supplier=Farnell, ComponentLink2Description=http://www.linear.com/docs/55649?src-supplier=Digi-Key, ComponentLink2URL=http://www.linear.com/docs/55649?src-supplier=Digi-Key, ComponentLink3Description=http://www.farnell.com/datasheets/1941078.pdf?src-supplier=Element14, ComponentLink3URL=http://www.farnell.com/datasheets/1941078.pdf?src-supplier=Element14, Manufacturer Part Number=LT3042EDD#PBF, Mount="Surface Mount", Number of Pins=10, Number of Regulators=1, Output Type=Adjustable, Output Voltage=15V, Packaging=Rail/Tube, Pricing 1="1=5,46000, 25=3,62360, 100=2,99600 (USD)", REACH SVHC="No SVHC", RoHS=Yes, Stock 1=15977, Supplier 1=Digi-Key
U63: "IC TXRX CAN 1MBPS SOT23-8", Case/Package=SOT-23-8, Manufacturer=Maxim, Max Operating Temperature=85°C, Max Supply Current=70mA, Max Supply Voltage=3.465V, Min Operating Temperature=-40°C, Min Supply Voltage=3.135V, Operating Supply Current=35mA, Operating Supply Voltage=3.3V, Package Quantity=1, Supplier Part Number 1=MAX3051EKA+TCT-ND, Category="Interface ICs", ComponentLink1Description=https://datasheet.ciiva.com/1711/max3051-1711845.pdf?src-supplier=Digi-Key, ComponentLink1URL=https://datasheet.ciiva.com/1711/max3051-1711845.pdf?src-supplier=Digi-Key, ComponentLink2Description=https://datasheet.ciiva.com/1711/max3051-1711846.pdf?src-supplier=Digi-Key, ComponentLink2URL=https://datasheet.ciiva.com/1711/max3051-1711846.pdf?src-supplier=Digi-Key, ComponentLink3Description=https://datasheet.ciiva.com/1711/max3051-1711847.pdf?src-supplier=Digi-Key, ComponentLink3URL=https://datasheet.ciiva.com/1711/max3051-1711847.pdf?src-supplier=Digi-Key, ComponentLink4Description=https://datasheet.ciiva.com/16639/max3051-16639464.pdf?src-supplier=Avnet+Europe, ComponentLink4URL=https://datasheet.ciiva.com/16639/max3051-16639464.pdf?src-supplier=Avnet+Europe, ComponentLink5Description=https://datasheet.ciiva.com/12072/max3051-74908-12072588.pdf?src-supplier=Mouser, ComponentLink5URL=https://datasheet.ciiva.com/12072/max3051-74908-12072588.pdf?src-supplier=Mouser, Contact Plating=Tin,Matte, Data Rate=1Mbps, Height=1.25mm, Interface=CAN, Length=2.9mm, Manufacturer Part Number=MAX3051EKA+T, Mount="Surface Mount", Number of Pins=8, Number of Receive Buffers=1, Number of Transceivers=1, Number of Transmit Buffers=1, Packaging="Tape and Reel", Pricing 1="1=2,27000, 10=2,04000, 25=1,92800, 100=1,58540, 250=1,58208 (USD)", Radiation Hardening=No, REACH SVHC=Unknown, RoHS=Yes, Stock 1=2708, Supplier 1=Digi-Key, Weight=0.01787oz, Width=1.625mm
U64_U_Pomiar_pradu_napiecia_1 U64_U_Pomiar_pradu_napiecia_2 U64_U_Pomiar_pradu_napiecia_3 U64_U_Pomiar_pradu_napiecia_4 U64_U_Pomiar_pradu_napiecia_5 U64_U_Pomiar_pradu_napiecia_6 U64_U_Pomiar_pradu_napiecia_7 U64_U_Pomiar_pradu_napiecia_8 U64_U_Pomiar_pradu_napiecia_9 U64_U_Pomiar_pradu_napiecia_10 U64_U_Pomiar_pradu_napiecia_11 U72: "IC MONITOR PWR/CURR BIDIR 10MSOP", Case/Package=VSSOP, Input Bias Current=10uA, Input Offset Voltage (Vos)=2.5uV, Manufacturer="Texas Instruments", Max Operating Temperature=125°C, Max Supply Voltage=5.5V, Min Operating Temperature=-40°C, Min Supply Voltage=2.7V, Nominal Supply Current=330uA, Output Current=10mA, Package Quantity=1, Supplier Part Number 1=296-29034-1-ND, Accuracy=0.02%, Common Mode Rejection Ratio=140dB, ComponentLink1Description=https://datasheet.ciiva.com/1939/ina226-1939633.pdf?src-supplier=Digi-Key, ComponentLink1URL=https://datasheet.ciiva.com/1939/ina226-1939633.pdf?src-supplier=Digi-Key, ComponentLink2Description=https://datasheet.ciiva.com/4875/sbos547-126280-4875559.pdf?src-supplier=Mouser, ComponentLink2URL=https://datasheet.ciiva.com/4875/sbos547-126280-4875559.pdf?src-supplier=Mouser, ComponentLink3Description=https://datasheet.ciiva.com/1939/ina226-1939634.pdf?src-supplier=Digi-Key, ComponentLink3URL=https://datasheet.ciiva.com/1939/ina226-1939634.pdf?src-supplier=Digi-Key, ComponentLink4Description=https://datasheet.ciiva.com/1939/ina226-1939635.pdf?src-supplier=Digi-Key, ComponentLink4URL=https://datasheet.ciiva.com/1939/ina226-1939635.pdf?src-supplier=Digi-Key, ComponentLink5Description=https://datasheet.ciiva.com/14196/ina226-14196741.pdf?src-supplier=Avnet, ComponentLink5URL=https://datasheet.ciiva.com/14196/ina226-14196741.pdf?src-supplier=Avnet, ComponentLink6Description=https://datasheet.ciiva.com/22693/1840205-22693516.pdf?src-supplier=Element14, ComponentLink6URL=https://datasheet.ciiva.com/22693/1840205-22693516.pdf?src-supplier=Element14, Contact Plating=Gold, Lead Free="Lead Free", Manufacturer Part Number=INA226AIDGSR, Mount="Surface Mount", Number of Pins=10, Packaging="Tape and Reel", Pricing 1="1 = 2,88000, 10 = 2,58900, 100 = 2,12100, 500 = 1,80554, 1000 = 1,52275 (USD)", Radiation Hardening=No, REACH SVHC="No SVHC", RoHS=Yes, Stock 1=62024, Supplier 1=Digi-Key
U65: "IC REG CTRLR BUCK 20-TQFN", Manufacturer=Maxim, Supplier Part Number 1=MAX17557ATP+-ND, ComponentLink1Description=https://datasheets.maximintegrated.com/en/ds/MAX17557.pdf?src-supplier=Digi-Key, ComponentLink1URL=https://datasheets.maximintegrated.com/en/ds/MAX17557.pdf?src-supplier=Digi-Key, Manufacturer Part Number=MAX17557ATP+, Pricing 1="1 = 3,92000, 10 = 3,52200, 25 = 3,33000, 100 = 2,73800, 250 = 2,45680, 500 = 2,36800, 1000 = 2,22000 (USD)", RoHS=No, Stock 1=460, Supplier 1=Digi-Key
U67 U68: "IC PWR SUPPLY SEQUENCER SOT23-6", Case/Package=SOT-23-6, Manufacturer="TI National Semiconductor", Max Operating Temperature=125°C, Max Supply Voltage=5.5V, Min Operating Temperature=-40°C, Min Supply Voltage=2.7V, Number of Voltages Monitored=3, Operating Supply Current=25uA, Overvoltage Threshold=1.4V, Package Quantity=250, Supplier Part Number 1=LM3880MFE-1AF/NOPBCT-ND, Undervoltage Threshold=1V, ComponentLink1Description=https://datasheet.ciiva.com/14811/snvs451i-14811203.pdf?src-supplier=Arrow, ComponentLink1URL=https://datasheet.ciiva.com/14811/snvs451i-14811203.pdf?src-supplier=Arrow, ComponentLink2Description=https://datasheet.ciiva.com/15105/getdatasheetpartid-633699-15105702.pdf?src-supplier=Verical, ComponentLink2URL=https://datasheet.ciiva.com/15105/getdatasheetpartid-633699-15105702.pdf?src-supplier=Verical, ComponentLink3Description=https://datasheet.ciiva.com/3231/lm3880-3231307.pdf?src-supplier=Avnet, ComponentLink3URL=https://datasheet.ciiva.com/3231/lm3880-3231307.pdf?src-supplier=Avnet, ComponentLink4Description=https://datasheet.ciiva.com/6598/lm3880-6598591.pdf?src-supplier=Digi-Key, ComponentLink4URL=https://datasheet.ciiva.com/6598/lm3880-6598591.pdf?src-supplier=Digi-Key, Lead Free="Lead Free", Manufacturer Part Number=LM3880MFE-1AF/NOPB, Mount="Surface Mount", Number of Pins=6, Packaging="Tape and Reel", Pricing 1="1 = 1,55000, 10 = 1,38600, 25 = 1,31520, 100 = 1,00980 (USD)", Quiescent Current=25uA, RoHS=Yes, Stock 1=1640, Supplier 1=Digi-Key, Watchdog Timer=No
U71: "IC REG LINEAR 8V 500MA SOT223-4", Case/Package=SOT-223-4, Dropout Voltage=2V, Manufacturer="Texas Instruments", Max Input Voltage=25V, Max Operating Temperature=125°C, Max Output Current=500mA, Min Input Voltage=10.5V, Min Operating Temperature=-40°C, Nominal Output Voltage=8V, Package Quantity=1, Power Supply Rejection Ratio (PSRR)=80dB, Quiescent Current=4.6mA, Supplier Part Number 1=296-12612-1-ND, Category="Voltage Regulators - Linear", ComponentLink1Description=https://datasheet.ciiva.com/2042/ua78m05-2042195.pdf?src-supplier=Digi-Key, ComponentLink1URL=https://datasheet.ciiva.com/2042/ua78m05-2042195.pdf?src-supplier=Digi-Key, ComponentLink2Description=https://datasheet.ciiva.com/2042/ua78m05-2042196.pdf?src-supplier=Digi-Key, ComponentLink2URL=https://datasheet.ciiva.com/2042/ua78m05-2042196.pdf?src-supplier=Digi-Key, ComponentLink3Description=https://datasheet.ciiva.com/2042/ua78m05-2042197.pdf?src-supplier=Digi-Key, ComponentLink3URL=https://datasheet.ciiva.com/2042/ua78m05-2042197.pdf?src-supplier=Digi-Key, ComponentLink4Description=https://datasheet.ciiva.com/7992/1882046-7992585.pdf?src-supplier=Element14, ComponentLink4URL=https://datasheet.ciiva.com/7992/1882046-7992585.pdf?src-supplier=Element14, Lead Free="Lead Free", Manufacturer Part Number=UA78M08CDCYR, Mount="Surface Mount", Number of Outputs=1, Number of Pins=4, Number of Regulators=1, Output Current=500mA, Output Type=Fixed, Output Voltage=8V, Packaging="Tape and Reel", Polarity=Positive, Pricing 1="1=0,60000, 10=0,52700, 25=0,49480, 100=0,37520, 250=0,31932, 500=0,30334, 1000=0,23149 (USD)", Radiation Hardening=No, REACH SVHC="No SVHC", RoHS=Yes, Stock 1=16238, Supplier 1=Digi-Key
U73: "IC REG LINEAR POS ADJ 800MA 8DFN", Case/Package=DFN, Dropout Voltage=700mV, Input Bias Current=150uA, Manufacturer=STMicroelectronics, Max Input Voltage=5.5V, Max Operating Temperature=125°C, Max Output Current=800mA, Min Input Voltage=1V, Min Operating Temperature=-40°C, Operating Supply Current=200nA, Output Voltage=4V, Package Quantity=2500, Power Supply Rejection Ratio (PSRR)=80dB, Supplier Part Number 1=497-15098-1-ND, Tolerance=2%, Accuracy=2%, ComponentLink1Description=https://datasheet.ciiva.com/48677/dm00123507-48677501.pdf?src-supplier=Avnet, ComponentLink1URL=https://datasheet.ciiva.com/48677/dm00123507-48677501.pdf?src-supplier=Avnet, Height=0.9mm, Lead Free="Lead Free", Length=2mm, Manufacturer Part Number=ST1L08SPUR, Mount="Surface Mount", Number of Outputs=1, Number of Pins=8, Number of Regulators=1, Output Current=800mA, Output Type=Adjustable, Packaging="Tape and Reel", Polarity=Positive, Pricing 1="1 = 0,72000, 10 = 0,63200, 25 = 0,59400, 100 = 0,45020, 250 = 0,38316, 500 = 0,36400, 1000 = 0,27779 (USD)", Quiescent Current=150uA, Radiation Hardening=No, RoHS=Yes, Stock 1=4850, Supplier 1=Digi-Key, Width=3mm
U74 U76: "IC GATE AND 1CH 2-INP SOT23-5", Case/Package=SOT-23, High Level Output Current=-32mA, Low Level Output Current=32mA, Manufacturer="Texas Instruments", Max Operating Temperature=125°C, Max Supply Voltage=5.5V, Min Operating Temperature=-40°C, Min Supply Voltage=1.65V, Package Quantity=1, Quiescent Current=10uA, Supplier Part Number 1=296-11601-1-ND, ComponentLink1Description=https://datasheet.ciiva.com/27049/756490-27049780.pdf?src-supplier=Jameco, ComponentLink1URL=https://datasheet.ciiva.com/27049/756490-27049780.pdf?src-supplier=Jameco, ComponentLink2Description=https://datasheet.ciiva.com/26048/sn74lvc1g08-26048421.pdf?src-supplier=Avnet+Europe, ComponentLink2URL=https://datasheet.ciiva.com/26048/sn74lvc1g08-26048421.pdf?src-supplier=Avnet+Europe, ComponentLink3Description=https://datasheet.ciiva.com/16503/sn74lvc1g08-16503398.pdf?src-supplier=Avnet+Asia, ComponentLink3URL=https://datasheet.ciiva.com/16503/sn74lvc1g08-16503398.pdf?src-supplier=Avnet+Asia, ComponentLink4Description=https://datasheet.ciiva.com/46439/1834190-46439158.pdf?src-supplier=Element14, ComponentLink4URL=https://datasheet.ciiva.com/46439/1834190-46439158.pdf?src-supplier=Element14, ComponentLink5Description=https://datasheet.ciiva.com/1864/sn74lvc1g08-1864152.pdf?src-supplier=Digi-Key, ComponentLink5URL=https://datasheet.ciiva.com/1864/sn74lvc1g08-1864152.pdf?src-supplier=Digi-Key, ComponentLink6Description=https://datasheet.ciiva.com/28540/1772545-28540795.pdf?src-supplier=Element14, ComponentLink6URL=https://datasheet.ciiva.com/28540/1772545-28540795.pdf?src-supplier=Element14, ComponentLink7Description=https://datasheet.ciiva.com/1864/sn74lvc1g08-1864153.pdf?src-supplier=Digi-Key, ComponentLink7URL=https://datasheet.ciiva.com/1864/sn74lvc1g08-1864153.pdf?src-supplier=Digi-Key, Contact Plating=Gold, Lead Free="Lead Free", Logic Function=AND, Manufacturer Part Number=SN74LVC1G08DBVR, Max Output Current=32mA, Mount="Surface Mount", Number of Bits=1, Number of Circuits=1, Number of Elements=1, Number of Gates=1, Number of Input Lines=2, Number of Inputs=2, Number of Output Lines=1, Number of Outputs=1, Number of Pins=5, Output Current=32mA, Packaging="Tape and Reel", Pricing 1="1 = 0,27000, 10 = 0,22100, 25 = 0,18560, 100 = 0,11740, 250 = 0,09064, 500 = 0,07726, 1000 = 0,05253 (USD)", Propagation Delay=4ns, Radiation Hardening=No, REACH SVHC="No SVHC", RoHS=Yes, Stock 1=64376, Supplier 1=Digi-Key, Termination=SMD/SMT, Turn-On Delay Time=4.5ns, Weight=0.000557oz
U75: "TVS DIODE 26.5VWM 44VC SOT323", Case/Package=SOT-323-3, Clamping Voltage=44V, Manufacturer=STMicroelectronics, Max Operating Temperature=175°C, Min Breakdown Voltage=28.5V, Min Operating Temperature=-55°C, Peak Pulse Current=3A, Peak Pulse Power=250W, Power Line Protection=No, Reverse Standoff Voltage=26.5V, Supplier Part Number 1=497-15845-1-ND, ComponentLink1Description=http://www.mouser.com/ds/2/389/esdcan02-2bwy-954689.pdf?src-supplier=Mouser, ComponentLink1URL=http://www.mouser.com/ds/2/389/esdcan02-2bwy-954689.pdf?src-supplier=Mouser, ComponentLink2Description=https://www.st.com/resource/en/datasheet/esdcan06-2bwy.pdf?src-supplier=Digi-Key, ComponentLink2URL=https://www.st.com/resource/en/datasheet/esdcan06-2bwy.pdf?src-supplier=Digi-Key, ComponentLink3Description=http://www.st.com/content/ccc/resource/sales_and_marketing/promotional_material/selection_guide/fa/8a/bd/fb/a8/06/42/00/sgdiodeauto.pdf/files/sgdiodeauto.pdf/jcr:content/translations/en.sgdiodeauto.pdf?src-supplier=Digi-Key, ComponentLink3URL=http://www.st.com/content/ccc/resource/sales_and_marketing/promotional_material/selection_guide/fa/8a/bd/fb/a8/06/42/00/sgdiodeauto.pdf/files/sgdiodeauto.pdf/jcr:content/translations/en.sgdiodeauto.pdf?src-supplier=Digi-Key, Composition=Zener, Manufacturer Part Number=ESDCAN02-2BWY, Mount="Surface Mount", Number of Bidirectional Channels=2, Packaging="Cut Tape", Pricing 1="1 = 0,43000, 10 = 0,32700, 25 = 0,29440, 100 = 0,15530, 250 = 0,15372, 500 = 0,13764, 1000 = 0,10712 (USD)", RoHS=Yes, Stock 1=3018, Supplier 1=Digi-Key
U77 U78: "Buffer/Driver 2-CH Non-Inverting Open Drain CMOS 6-Pin MicroPak T/R", Low Level Output Current=32mA, Manufacturer="ON Semiconductor / Fairchild", Max Operating Temperature=85°C, Max Supply Voltage=5.5V, Min Operating Temperature=-40°C, Min Supply Voltage=1.65V, Package Quantity=5000, Quiescent Current=1uA, Supplier Part Number 1=NC7WZ07FHXCT-ND, Category="Buffers, Drivers and Transceivers", ComponentLink1Description=http://components.arrow.com/part/dataview/50566895S8849776N7769?src-supplier=Arrow, ComponentLink1URL=http://components.arrow.com/part/dataview/50566895S8849776N7769?src-supplier=Arrow, ComponentLink2Description=http://www.mouser.com/ds/2/149/NC7WZ07-116137.pdf?src-supplier=Mouser, ComponentLink2URL=http://www.mouser.com/ds/2/149/NC7WZ07-116137.pdf?src-supplier=Mouser, ComponentLink3Description=http://uk.rs-online.com/webdocs/12cf/0900766b812cff2b.pdf?src-supplier=RSComponents, ComponentLink3URL=http://uk.rs-online.com/webdocs/12cf/0900766b812cff2b.pdf?src-supplier=RSComponents, ComponentLink4Description=http://components.arrow.com/part/dataview/0323_03242749?src-supplier=Arrow+Europe, ComponentLink4URL=http://components.arrow.com/part/dataview/0323_03242749?src-supplier=Arrow+Europe, ComponentLink5Description=http://www.produktinfo.conrad.com/datenblaetter/1200000-1299999/001253547-da-01-en-IC_BUFFER_UHS_DUA_NC7WZ07FHX_UFDFN_6_FSC.pdf?src-supplier=Conrad, ComponentLink5URL=http://www.produktinfo.conrad.com/datenblaetter/1200000-1299999/001253547-da-01-en-IC_BUFFER_UHS_DUA_NC7WZ07FHX_UFDFN_6_FSC.pdf?src-supplier=Conrad, ComponentLink6Description=https://www.fairchildsemi.com/datasheets/NC/NC7WZ07.pdf?src-supplier=Avnet, ComponentLink6URL=https://www.fairchildsemi.com/datasheets/NC/NC7WZ07.pdf?src-supplier=Avnet, ComponentLink7Description=http://www.fairchildsemi.com/datasheets/NC/NC7WZ07.pdf?src-supplier=Digi-Key, ComponentLink7URL=http://www.fairchildsemi.com/datasheets/NC/NC7WZ07.pdf?src-supplier=Digi-Key, ComponentLink8Description=https://www.fairchildsemi.com/datasheets/NC/NC7WZ07.pdf?src-supplier=Digi-Key, ComponentLink8URL=https://www.fairchildsemi.com/datasheets/NC/NC7WZ07.pdf?src-supplier=Digi-Key, ComponentLink9Description=https://www.onsemi.com/pub/Collateral/NC7WZ07-D.pdf?src-supplier=Digi-Key, ComponentLink9URL=https://www.onsemi.com/pub/Collateral/NC7WZ07-D.pdf?src-supplier=Digi-Key, Height=0.55mm, Length=1mm, Logic Function=Buffer,Inverting, Manufacturer Part Number=NC7WZ07FHX, Mount="Surface Mount", Number of Bits per Element=1, Number of Channels=2, Number of Elements=2, Number of Input Lines=2, Number of Inputs=2, Number of Output Lines=2, Number of Outputs=2, Number of Pins=6, Packaging="Tape and Reel", Polarity=Non-Inverting, Pricing 1="1=0,62000, 10=0,53300, 100=0,39800, 500=0,31270, 1000=0,24164 (USD)", Propagation Delay=12.6ns, RoHS=Yes, Schmitt Trigger Input=No, Stock 1=3074, Supplier 1=Digi-Key, Turn-On Delay Time=12.6ns, Weight=0.02g, Width=1mm